# Altium PCB Water Tank Telemeter.PcbDoc (part 2 of 2)
Units mil, origin at the board's own origin, x right, y up, seen from the top; angles counter-clockwise.
Board outline 8312.51 x 5080.46 mil, 2 copper layers (Top Layer, Bottom Layer); 201 components, 141 nets, 680 pads, 198 vias.
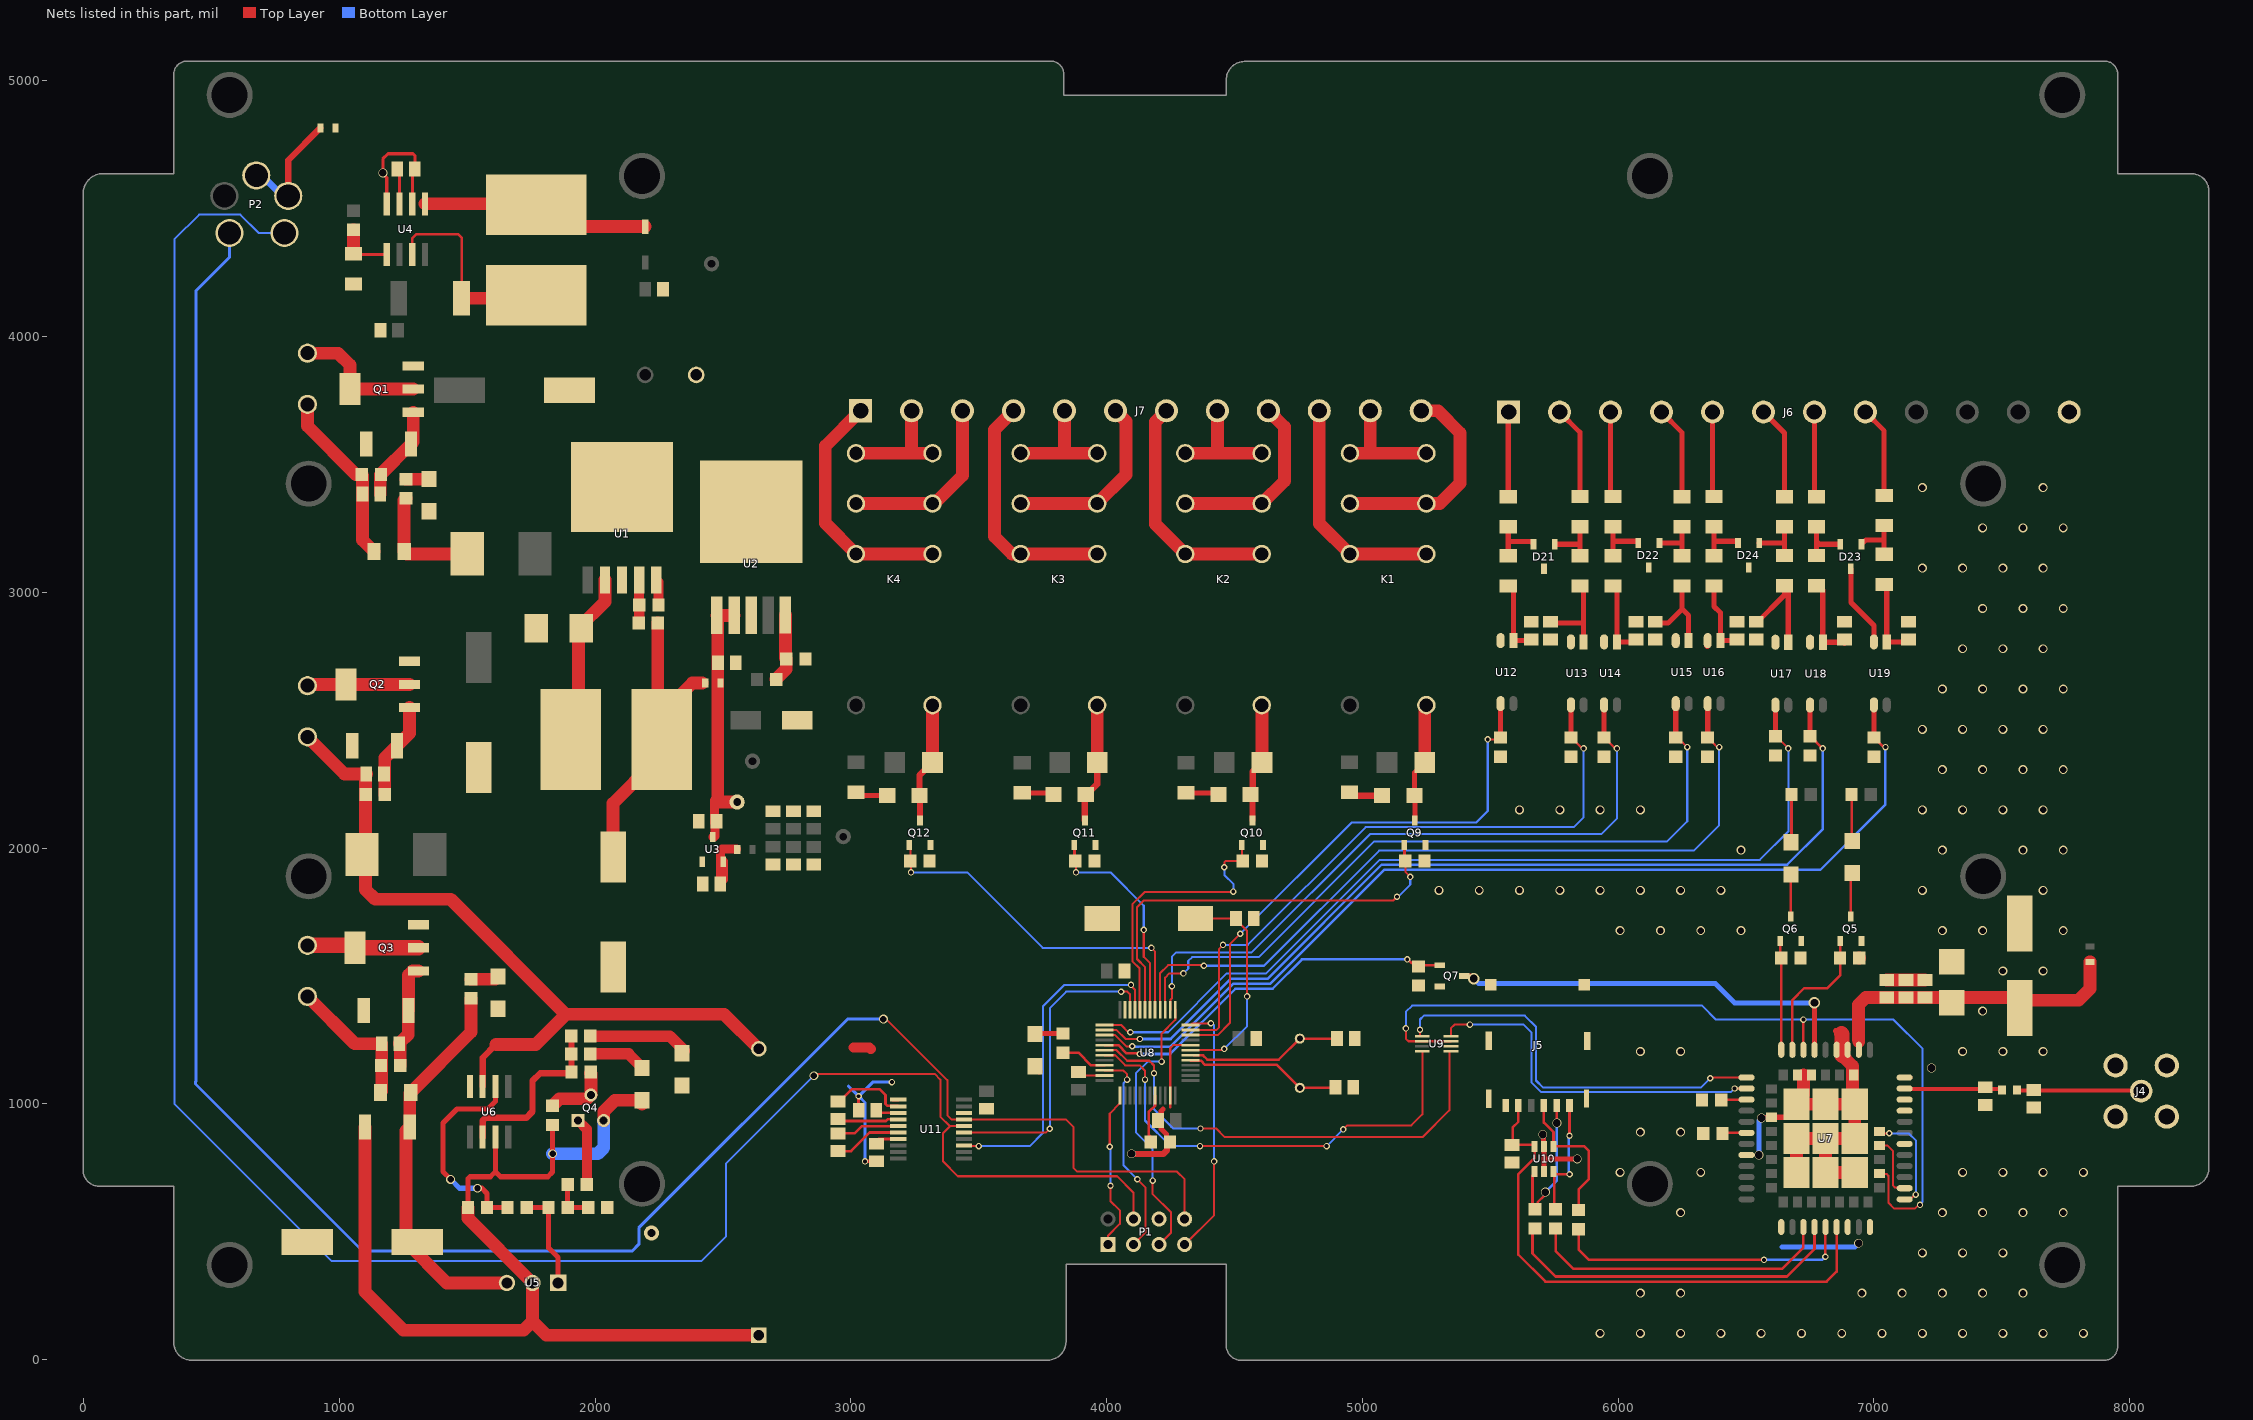
[diagram p2: the nets of this part, all layers, seen from the top]

## Via types
v1: diameter 35, hole 25, Top Layer to Bottom Layer, 102 vias
v2: diameter 25, hole 15, Top Layer to Bottom Layer, tented both sides, 70 vias
v3: diameter 35, hole 30, Top Layer to Bottom Layer, tented both sides, 12 vias
v4: diameter 45, hole 30, Top Layer to Bottom Layer, tented both sides, 6 vias
v5: diameter 35, hole 25, Top Layer to Bottom Layer, tented both sides, 3 vias
v6: diameter 25, hole 15, Top Layer to Bottom Layer, 3 vias
v7: diameter 55, hole 35, Top Layer to Bottom Layer, 1 vias
v8: diameter 40, hole 30, Top Layer to Bottom Layer, tented both sides, 1 vias

## Nets (pads, with @x,y where several pads share a name; then routed paths per layer and width w, separated by ;. In a path a pad name is that pad's centre, name@x,y a point inside that pad or via, vN(x,y) a via of type N, cw(c..) or ccw(c..) an arc to the next point about the centre after c; other vN are vias at no path point) (continued)
GND: C1.2 C2.2 C4.1 C5.2 C6.1 C7.1 C8.2 C9.2 C10.2 C11.2 C12.2 C13.2 C16.1 C17.1 C18.1 C19.2 C20.2 C21.1 C22.1 C23.2 C24.1 C25.1 C26.1 C27.1 C28.1 C29.1 C30.2 C31.2 C32.2 C33.2 C34.1 C35.2 C36.2 C38.1 C40.1 C41.2 C42.2 C43.2 C44.2 C45.2 C46.2 C47.2 C48.2 C49.2 D2.2 D3.2 D4.2 D5.2 D21.3 D22.3 D23.3 D24.3 FB3.1 J4.2 J5.C5 J5.Shield J6.12 LED1.1 LED2.1 LED4.1 LED5.1 P1.6 Q1.3 Q2.3 Q3.3 Q5.1 Q6.1 Q7.1 Q9.1 Q10.1 Q11.1 Q12.1 R1.2 R6.2 R9.1 R15.2 R24.2 R25.2 R29.1 R30.1 R34.1 R35.1 R37.2 R38.2 R39.2 R40.2 R45.2 R46.2 R47.2 R48.1 R49.1 R50.2 R51.2 R52.2 SW1.2 TP5.1 U1.3 U1.5 U1.6 U2.3 U2.PAD U3.2 U4.2 U4.4 U6.4 U7.8 U7.13 U7.19 U7.21 U7.27 U7.30 U7.31 U7.33 U7.36 U7.37 U7.45 U7.63 U7.66 U7.67 U7.69 U7.70 U7.71 U7.72 U7.73 U7.74 U7.75 U7.76 U7.77 U8.8 U8.23 U8.35 U8.47 U9.2 U10.2 U10.5 U11.1 U11.18 U12.2 U13.2 U14.2 U15.2 U16.2 U17.2 U18.2 U19.2 | length 4935.8
  Top Layer w8: C33.2@3890,1124.45 3903.03,1111.42 U8.35@3992,1111.42 ; C36.2@4213.39,953.94 C36.2@4219.39,959.94 ; 4248.58,985 U8.47@4248.58,1032 4248.58,1218.58 4259.53,1229.53 U8.8@4328,1229.53
  Top Layer w12: U4.4@1185,4519.05 1185,4621.48 1170,4636.48 v3(1170,4640) 1170,4695 1190,4715 1287.97,4715 1295,4707.97 1295,4655.55 C10.2@1294.45,4655 1285,4645.55 U4.2@1285,4519.05 ; v2(3030,1030) 3030,975.55 C38.1@3030.55,975 ; v2(3055,775) 3055.55,775.55 C40.1@3100,775.55 ; U11.1@3161.87,1016.18 U11.1@3185,1016.18
  Top Layer w20: 4220,979 4213.39,972.39 4213.39,953.94 4213.39,947.83 C36.2@4200.55,935 4213.39,922.17 4213.39,901.61 4233.5,881.5 4233.5,864 R34.1@4247.5,850 ; v3(5705,880) 5705,875.94 5708,872.94 5708,836 U10.5@5710,834 5710,785 ; U10.2@5710,736 5710,785 ; U13.2@5815,2806.06 U13.2@5815,2819.84 ; v3(5840,785) 5710,785 ; v3(6560,945) 6561.34,946.34 6598.86,946.34 U7.45@6600.2,947.68 6655.31,947.68 6696.65,989.02 U7.69@6696.65,998.86 ; 6725,1113.03 U7.66@6755.71,1113.03 ; D23.3@6910,3092 6910,2960 7000,2870 U19.2@7000,2806.06 ; U7.75@6921.06,1025 6921.06,1002.8 U7.75@6925,998.86 ; U7.33@7119.88,1103.19 U7.33@7140.55,1103.19
  Top Layer w22: 6850,1285 6860.82,1274.18 6872.94,1274.18 ; U7.36@6897.44,1211.46 U7.36@6897.44,1226.74
  Top Layer w25: C40.1@3100,775.55 C40.1@3105.14,770.41 ; LED5.1@3707.99,1135 LED5.1@3720,1147.01 3720,1145.04 LED5.1@3737.03,1128.01 ; v3@4113.71,804 4221.36,804 4236,818.64 4236,838.5 R34.1@4247.5,850 ; U12.2@5540,2811.06 U12.2@5541.24,2809.82 ; U16.2@6348.12,2790.82 6348.76,2791.45 6348.76,2809.82 U16.2@6350,2811.06
  Top Layer w39.37: U1.5@2239,3049 2247.5,3040.5 R1.2@2247.5,2950 ; 3009.53,1220 3072.5,1220 3077.5,1215
  Top Layer w50: U7.71@6696.65,731.14 U7.70@6696.65,865 U7.77@6810.83,865 ; U7.69@6696.65,998.86 U7.76@6810.83,998.86 U7.75@6925,998.86 U7.74@6925,865 U7.77@6810.83,865 ; U7.69@6725,1034.88 6725,1113.03 ; 6875,1190.02 6916.66,1148.35 6916.66,1113.03 6916.66,1029.4 U7.75@6921.06,1025 ; U7.73@6925,731.14 U7.72@6810.83,731.14 U7.77@6810.83,865 ; R30.1@6942.5,1570 6943,1570 R30.1@6943.5,1570.5 ; C16.1@7050,1484.45 C17.1@7125,1484.45 C18.1@7200,1484.45
  Top Layer w60: 6872.94,1274.18 6875,1272.12 6875,1190.02
  Bottom Layer w12: 2990,1070 v2(3030,1030) ; v2(3055,775) 3055,1005 v2(3030,1030) ; v2(3160,1085) 3085,1085 v2(3030,1030)
  Bottom Layer w20: v3(6550,800) 6550,935 v3(6560,945) ; 6640,440 6925.13,440 v3(6940.13,455)
  other v1: 5929.13,102.36 6086.61,102.36 6244.09,102.36 6401.57,102.36 6559.05,102.36 6716.53,102.36 6874.02,102.36 7031.5,102.36 7188.98,102.36 7346.46,102.36 7503.94,102.36 7661.42,102.36 7818.9,102.36 6086.61,259.84 6244.09,259.84 6952.76,259.84 7110.24,259.84 7267.72,259.84 7425.2,259.84 7582.68,259.84 7188.98,417.32 7346.46,417.32 7503.94,417.32 6244.09,574.8 7267.72,574.8 7425.2,574.8 7582.68,574.8 7740.16,574.8 6007.87,732.28 6322.83,732.28 7346.46,732.28 7503.94,732.28 7661.42,732.28 7818.9,732.28 6086.61,889.76 6244.09,889.76 6086.61,1204.72 6244.09,1204.72 7346.46,1204.72 7503.94,1204.72 7661.42,1204.72 7425.2,1362.2 7503.94,1519.68 7661.42,1519.68 6007.87,1677.17 6165.35,1677.17 6322.83,1677.17 6480.31,1677.17 7267.72,1677.17 7425.2,1677.17 7740.16,1677.17 5299.21,1834.65 5456.69,1834.65 5614.17,1834.65 5771.65,1834.65 5929.13,1834.65 6086.61,1834.65 6244.09,1834.65 6401.57,1834.65 7188.98,1834.65 7661.42,1834.65 6480.31,1992.13 7267.72,1992.13 7582.68,1992.13 7740.16,1992.13 5614.17,2149.61 5771.65,2149.61 5929.13,2149.61 6086.61,2149.61 7188.98,2149.61 7346.46,2149.61 7503.94,2149.61 7661.42,2149.61 7267.72,2307.09 7425.2,2307.09 7582.68,2307.09 7740.16,2307.09 7188.98,2464.57 7346.46,2464.57 7503.94,2464.57 7661.42,2464.57 7267.72,2622.05 7425.2,2622.05 7582.68,2622.05 7740.16,2622.05 7346.46,2779.53 7503.94,2779.53 7661.42,2779.53 7425.2,2937.01 7582.68,2937.01 7740.16,2937.01 7188.98,3094.49 7346.46,3094.49 7503.94,3094.49 7661.42,3094.49 7425.2,3251.97 7582.68,3251.97 7740.16,3251.97 7188.98,3409.45 7661.42,3409.45
  other v3: 4097.29,805 7225,1140
NetC2_1: C2.1 FB1.1 L1.1 R2.1 | length 1142.5
  Top Layer w50: C2.1@2070,2040 2070,2175 2229,2334 2229,2425 2245,2441 L1.1@2245,2510 ; R2.1@2245,2880 L1.1@2245,2510 ; FB1.1@2419.06,2645 2380,2645 L1.1@2245,2510
NetC3_1: C3.1 D2.1 Q1.1 R3.2 | length 374.2
  Top Layer w50: C3.1@1159.45,3385 1159.45,3456.95 R3.2@1162.5,3460 ; R3.2@1159.93,3460 D2.1@1279.93,3580 1289,3589.07 Q1.1@1289,3704.45
NetC3_2: C3.2 F1.2 J1.2 R3.1 | length 695.9
  Top Layer w50: J1.2@875,3735 875,3650 1065,3460 R3.1@1087.5,3460 1090.55,3456.95 C3.2@1090.55,3385 1090.55,3204.45 F1.2@1135,3160
NetC4_2: C4.2 C6.2 FB1.2 TP1.1 U2.1 U2.2 U3.3 | length 1029.6
  Top Layer w35: U3.3@2460,2043 2464,2043 2469.11,2048.11 2469.11,2099.67 C6.2@2474.45,2105 ; C6.2@2465.83,2098.83 2465.83,2171.94
  Top Layer w50: 2474.11,2185.05 2474.06,2180.16 ; 2478.9,2185 2474.06,2180.16 ; 2479.45,2185 2479.45,2906.69 U2.1@2476.14,2910 U2.2@2543.07,2910 ; TP1.1@2555,2180 2474.06,2180 2474.06,2180.16
NetC7_2: C7.2 FB2.1 U3.1 | length 282.8
  Top Layer w35: C7.2@2489.45,1860 C7.2@2489.45,1866.1 ; U3.1@2501.34,1947 2501.34,1877.99 C7.2@2489.45,1866.1 ; FB2.1@2553.47,1997 2496.34,1997 2489.45,1990.11 C7.2@2489.45,1866.1
NetC10_1: C10.1 U4.3 | length 139.9
  Top Layer w12: C10.1@1225.55,4655 1235,4645.55 U4.3@1235,4519.05
NetC13_1: C13.1 D7.1 F2.1 R22.1 U5.3 | length 1519.4
  Top Layer w50: R22.1@1515,1412.5 1515,1281 F2.1@1279,1045 1274.93,1040.93 D7.1@1274.93,910 1260,895.07 1260,460 1420,300 U5.3@1655,300
NetC14_1: C14.1 D4.1 Q2.1 R20.2 | length 379.4
  Top Layer w50: R20.2@1177.5,2210 1177.5,2352.57 D4.1@1224.93,2400 1274,2449.07 Q2.1@1274,2549.45
NetC14_2: C14.2 D8.2 J3.2 R10.2 R20.1 U6.3 | length 3032.9
  Top Layer w25: U6.3@1560,1068.09 1560,1180 1612.5,1232.5
  Top Layer w50: J3.2@875,2435 1020,2290 C14.2@1105.55,2290 1102.5,2286.95 R20.1@1102.5,2210 1102.5,1837.5 1140,1800 1435,1800 1885,1350 2505,1350 R10.2@2640,1215 ; 1612.5,1232.5 1767.5,1232.5 1875,1340
NetC15_1: C15.1 D3.1 Q3.1 R21.2 | length 418.6
  Top Layer w50: C15.1@1234.45,1235 1234.45,1236.77 C15.1@1237.5,1239.82 ; R21.2@1237.5,1150 C15.1@1237.5,1239.82 ; Q3.1@1309,1519.45 1286,1519.45 1269.93,1503.38 D3.1@1269.93,1365 1268.93,1364 1268.93,1271.25 C15.1@1237.5,1239.82
NetC15_2: C15.2 F2.2 J2.2 R21.1 | length 559.1
  Top Layer w50: J2.2@875,1420 1060,1235 C15.2@1165.55,1235 1165.55,1049.55 F2.2@1161,1045
NetC16_2: C16.2 C17.2 C18.2 C19.1 C20.1 FB5.1 U7.35 | length 1222.3
  Top Layer w50: U7.35@6940.75,1242.65 6940.75,1249.71 6940,1250.46 6940,1387.77 6967.23,1415 6967.5,1415 6968.05,1415.55 C16.2@7050,1415.55 C17.2@7125,1415.55 C18.2@7200,1415.55 7545,1415.55 7570,1390.55 C20.1@7570,1380 ; C20.1@7570,1375 C20.1@7570,1380 ; FB5.1@7845,1555.47 7845,1450 7800,1405 7595,1405 C20.1@7570,1380
NetC21_2: C21.2 J4.1 R23.2 | length 487.1
  Top Layer w12: R23.2@7560,1055 R23.2@7562.5,1052.5 ; J4.1@8042.5,1052.5 J4.1@8045,1050
  Top Layer w14.8: R23.2@7562.5,1052.5 J4.1@8042.5,1052.5
NetC22_2: C22.2 R23.1 U7.32 | length 383.7
  Top Layer w12: U7.32@7119.88,1059.88 U7.32@7122.11,1057.66 ; R23.1@7498.29,1057.66 R23.1@7500.94,1055
  Top Layer w14.8: U7.32@7122.11,1057.66 7434.57,1057.66 R23.1@7498.29,1057.66
  Top Layer w20: C22.2@7434.57,1059.88 C22.2@7435,1059.45
NetC23_1: C23.1 J5.C1 U7.18 U10.6 | length 2183.6
  Top Layer w10: J5.C1@5609.61,993.94 5610,993.54 5610,930 5587.11,907.11 5587.11,841.56 C23.1@5585,839.45 5667.55,839.45 U10.6@5673,834 5673,788.39 5610,725.39 5610,410 5715,305 6815,305 6854.13,344.13 U7.18@6854.13,518.54
NetC30_1: C30.1 SW1.1 U8.7 | length 857.2
  Top Layer w8: U8.7@4328,1209.84 4454.84,1209.84 v2(4460,1215) ; SW1.1@4345,1727.09 SW1.1@4347.09,1725 4500,1725 4549,1675.98 v2(4549,1420)
  Bottom Layer w8: v2(4460,1215) 4549,1304 v2(4549,1420)
NetC31_1: C31.1 U8.6 Y1.1 | length 595.7
  Top Layer w10: U8.6@4341,1190.16 4341.44,1189.72 4341.72,1190 4358.28,1190 4359,1189.29 4376.67,1189.29 4393.46,1172.5 4672.5,1172.5 Y1.1@4755,1255 C31.1@4895,1255
NetC32_1: C32.1 U8.5 Y1.2 | length 616
  Top Layer w10: U8.5@4328,1170.47 4328,1169.29 4368.38,1169.29 4385.17,1152.5 4665.37,1152.5 Y1.2@4755,1062.87 ; Y1.2@4752.13,1062.87 Y1.2@4755,1062.87 ; C32.1@4895,1065 4892.87,1062.87 Y1.2@4755,1062.87
NetC37_1: C37.1 U11.4 | length 240.7
  Top Layer w10: C37.1@2950,940.55 2957.49,933.06 3137.12,933.06 3143.46,939.41 U11.4@3185,939.41
NetC37_2: C37.2 U11.2 | length 302.6
  Top Layer w10: C37.2@2950,1009.45 2956.1,1009.45 3004.15,1057.5 3111.93,1057.5 3135.28,1034.14 3135.28,1000 3141.82,993.46 3182.13,993.46 U11.2@3185,990.59
NetC38_2: C38.2 U11.3 | length 83.2
  Top Layer w10: C38.2@3103.9,970 3108.9,965 U11.3@3185,965
NetC39_1: C39.1 U11.6 | length 265.1
  Top Layer w10: C39.1@2950,815.55 3000.95,815.55 3073.46,888.06 3184.84,888.06 U11.6@3185,888.23
NetC39_2: C39.2 U11.5 | length 247.2
  Top Layer w10: C39.2@2950,884.45 3014.45,884.45 3043.06,913.06 3184.24,913.06 U11.5@3185,913.82
NetC40_2: C40.2 U11.7 | length 88.4
  Top Layer w10: C40.2@3100,854.45 3108.19,862.64 U11.7@3185,862.64
NetC42_1: C42.1 R53.2 U12.1 | length 296.4
  Top Layer w20: R53.2@5570,3025 5574,3025 5590,3009 U12.1@5590,2811.06 5655.51,2811.06 C42.1@5660,2815.55
NetC43_1: C43.1 R54.2 U13.1 | length 357.2
  Top Layer w20: C43.1@5735,2880 5860,2880 5865,2885 ; R54.2@5850,3025 5865,3010 5865,2885 ; U13.1@5865,2806.06 5865,2885
NetC44_1: C44.1 R55.2 U14.1 | length 287
  Top Layer w20: R55.2@5980,3025 5995,3010 U14.1@5995,2806.06 6050.51,2806.06 C44.1@6055,2810.55
NetC45_1: C45.1 R56.2 U15.1 | length 362.3
  Top Layer w20: C45.1@6135,2879.45 6194.45,2879.45 6250,2935 ; R56.2@6250,3025 6250,2935 ; U15.1@6275,2811.06 6275,2910 6250,2935
NetC46_1: C46.1 R57.2 U16.1 | length 289.5
  Top Layer w20: R57.2@6375,3025 6375,2945 6400,2920 U16.1@6400,2811.06 6464.49,2811.06 C46.1@6465,2810.55
NetC47_1: C47.1 R58.2 U17.1 | length 419.3
  Top Layer w20: C47.1@6540,2879.45 6650,2989.45 R58.2@6650,3026 6665,3011 U17.1@6665,2805
NetC48_1: C48.1 R59.2 U18.1 | length 322.6
  Top Layer w20: R59.2@6775,3026 6782.5,3026 6800,3008.5 U18.1@6800,2805 6880.55,2805 C48.1@6885,2800.55
NetC49_1: C49.1 R60.2 U19.1 | length 314.3
  Top Layer w20: R60.2@7040,3031 7050,3021 U19.1@7050,2806.06 7134.49,2806.06 C49.1@7135,2805.55
NetD1_2: D1.2 F1.1 R4.1 | length 483.5
  Top Layer w50: R4.1@1260,3367.5 1253,3360.5 F1.1@1253,3160 1263,3150 D1.2@1522,3150
NetD5_1: D5.1 L1.2 U1.2 | length 668.6
  Top Layer w50: L1.2@1939,2425 1934.62,2429.38 1934.62,2860 2038,2963.38 U1.2@2038,3049
NetD6_2: D6.2 L2.1 U4.1 | length 801.9
  Top Layer w50: U4.1@1335,4519.05 1735.95,4519.05 1770,4485 L2.1@1825.09,4429.91 ; L2.1@1920.09,4429.91 D6.2@2195,4429.91
NetD7_2: D7.2 LED3.2 Q4.3 R10.1 R11.1 R16.1 U5.2 U6.7 | length 4157.3
  Top Layer w20: R11.1@1502.5,595 1502.5,707.5 1510,715 1590,715 1610,735 ; U6.7@1610,870 1610,735 ; R16.1@1833.5,917.5 v5(1833.5,805) 1833.5,733.5 1815,715 1630,715 1610,735
  Top Layer w50: D7.2@1100,910 1100,265 1250,115 1720,115 1755,150 ; R11.1@1502.5,595 1502.5,552.5 U5.2@1755,300 1755,150 ; Q4.3@2033.31,934.86 2033.31,969.81 2077.52,1014.02 LED3.2@2183.5,1014.02 LED3.2@2183.5,1000 ; R10.1@2640,95 1810,95 1755,150
  Bottom Layer w50: v5(1833.5,805) 2010,805 2033.31,828.31 Q4.3@2033.31,934.86
NetD17_1: D17.1 K1.1 LED8.1 Q9.3 | length 471.3
  Top Layer w20: Q9.3@5205,2108 5205,2202.99 LED8.1@5202.99,2205 5202.99,2294.57 D17.1@5243.43,2335
  Top Layer w50: D17.1@5243.43,2335 5243.43,2552.43 K1.1@5250,2559
NetD18_1: D18.1 K2.1 LED9.1 Q10.3 | length 466.5
  Top Layer w25: Q10.3@4570,2108 4570,2203.58 4571.42,2205 4571.42,2299.57 D18.1@4606.85,2335
  Top Layer w50: K2.1@4606.33,2559 4606.85,2558.48 D18.1@4606.85,2335
NetD19_1: D19.1 K3.1 LED10.1 Q11.3 | length 471.4
  Top Layer w25: Q11.3@3915,2108 3915,2202.01 3963.43,2250.43 D19.1@3963.43,2335
  Top Layer w50: K3.1@3962.67,2559 3963.43,2558.24 D19.1@3963.43,2335
NetD20_1: D20.1 K4.1 LED11.1 Q12.3 | length 473
  Top Layer w8: LED11.1@3267.99,2205 LED11.1@3267.99,2220
  Top Layer w25: LED11.1@3267.99,2205 3270,2202.99 Q12.3@3270,2108 ; LED11.1@3267.99,2220 3267.99,2284.57 D20.1@3318.43,2335
  Top Layer w50: D20.1@3318.43,2335 3319,2335.57 K4.1@3319,2559
NetD21_1: D21.1 R53.1 R61.2 | length 221.7
  Top Layer w20: R53.1@5570,3143 5570,3199.5 ; R61.2@5570,3256 5570,3199.5 ; D21.1@5668.66,3188 5668.66,3197 5667.66,3198 5658.66,3198 5657.16,3199.5 5570,3199.5
NetD21_2: D21.2 R54.1 R62.2 | length 213.5
  Top Layer w20: D21.2@5751.34,3188 5848,3188 5850,3190 ; R54.1@5850,3143 5850,3190 ; R62.2@5850,3257 5850,3190
NetD22_1: D22.1 R55.1 R63.2 | length 219.1
  Top Layer w20: R55.1@5980,3143 5980,3200 ; R63.2@5980,3257 5980,3200 ; D22.1@6078.66,3193 6078.66,3199 6077.66,3200 5980,3200
NetD22_2: D22.2 R56.1 R64.2 | length 204.4
  Top Layer w20: D22.2@6161.34,3193 6243.5,3193 6250,3199.5 ; R56.1@6250,3143 6250,3199.5 ; R64.2@6250,3256 6250,3199.5
NetD23_1: D23.1 R59.1 R67.2 | length 210.6
  Top Layer w20: R59.1@6775,3144 6775,3200 ; R67.2@6775,3256 6775,3200 ; D23.1@6868.66,3188 6787,3188 6775,3200
NetD23_2: D23.2 R60.1 R68.2 | length 213
  Top Layer w20: D23.2@6951.34,3188 6951.34,3197 6952.34,3198 6961.34,3198 6968.34,3205 7040,3205 ; R60.1@7040,3149 7040,3205 ; R68.2@7040,3261 7040,3205
NetD24_1: D24.1 R57.1 R65.2 | length 214.1
  Top Layer w20: R57.1@6375,3143 6375,3200 ; R65.2@6375,3257 6375,3200 ; D24.1@6468.66,3193 6468.66,3199 6467.66,3200 6375,3200
NetD24_2: D24.2 R58.1 R66.2 | length 213.6
  Top Layer w20: D24.2@6551.34,3193 6643,3193 6650,3200 ; R58.1@6650,3144 6650,3200 ; R66.2@6650,3256 6650,3200
NetFB3_2: FB3.2 P2.3 P2.4 | length 475.6
  Top Layer w25: P2.4@800,4550 800,4690 FB3.2@925.47,4815.47
  Bottom Layer w25: P2.3@675,4630 697.5,4630 777.5,4550 P2.4@800,4550
NetJ1_1: J1.1 Q1.2 | length 527.1
  Top Layer w50: J1.1@875,3935 995,3935 1041,3889 Q1.2@1041,3795 Q1.2@1289,3795
NetJ2_1: J2.1 Q3.2 | length 438.1
  Top Layer w60: J2.1@875,1620 1051,1620 Q3.2@1061,1610 Q3.2@1309,1610
NetJ3_1: J3.1 Q2.2 | length 401.1
  Top Layer w50: J3.1@875,2635 880,2640 Q2.2@1026,2640 Q2.2@1274,2640
NetJ5_C2: J5.C2 R28.1 U10.4 | length 569.3
  Top Layer w10: J5.C2@5709.61,993.94 5709.61,927.12 5747,889.73 U10.4@5747,834 5748,835 5865.96,835 5885,815.96 5885,705.36 5845,665.36 R28.1@5845,585
NetJ5_C3: J5.C3 R27.1 U10.1 | length 603.6
  Top Layer w10: U10.1@5673,736 5673,726.5 5665,718.5 5665,585 5666.5,585 5685.5,604 5685.5,615.5 5710.22,640.22 5710.22,650.22 v3(5715,655) ; J5.C3@5759.61,993.94 5759.61,925.39 v3(5760,925)
  Bottom Layer w10: v3(5715,655) 5760,700 v3(5760,925)
NetJ5_C7: J5.C7 R26.1 U10.3 | length 489
  Top Layer w10: U10.3@5747,736 U10.3@5750,733 ; R26.1@5755,585 5750,590 U10.3@5750,733 ; J5.C7@5809.61,993.94 v2(5809.61,875.39) v2@5810,875 ; v2(5810,725) 5758,725 U10.3@5750,733
  Bottom Layer w10: v2(5809.61,875.39) 5807.5,873.29 5807.5,727.5 v2(5810,725)
NetJ6_1: J6.1 R61.1 | length 331.6
  Top Layer w20: R61.1@5570,3374 5570,3703.45 J6.1@5571.55,3705
NetJ6_2: J6.2 R62.1 | length 362.8
  Top Layer w20: J6.2@5770.82,3705 5850,3625.82 R62.1@5850,3375
NetJ6_3: J6.3 R63.1 | length 334.1
  Top Layer w20: J6.3@5970.09,3705 5970.09,3384.91 R63.1@5980,3375
NetJ6_4: J6.4 R64.1 | length 364.4
  Top Layer w20: J6.4@6169.37,3705 6250,3624.37 R64.1@6250,3374
NetJ6_5: J6.5 R65.1 | length 332.6
  Top Layer w20: J6.5@6368.64,3705 6368.64,3381.36 R65.1@6375,3375
NetJ6_6: J6.6 R66.1 | length 365
  Top Layer w20: J6.6@6567.91,3705 6650,3622.91 R66.1@6650,3374
NetJ6_7: J6.7 R67.1 | length 334.2
  Top Layer w20: J6.7@6767.18,3705 6767.18,3381.82 R67.1@6775,3374
NetJ6_8: J6.8 R68.1 | length 356.5
  Top Layer w20: J6.8@6966.46,3705 7040,3631.46 R68.1@7040,3379
NetJ7_1: J7.1 K4.2 K4.7 | length 965.8
  Top Layer w50: J7.1@3037.91,3710 2900,3572.09 2900,3270 K4.7@3020,3150 K4.2@3319,3150
NetJ7_2: J7.2 K4.4 K4.5 | length 465
  Top Layer w50: K4.5@3020,3544 3237.18,3544 ; J7.2@3237.18,3710 3237.18,3544 ; K4.4@3319,3544 3237.18,3544
NetJ7_3: J7.3 K4.3 K4.6 | length 715.3
  Top Layer w50: K4.6@3020,3347 K4.3@3319,3347 3327,3347 3436.45,3456.45 J7.3@3436.45,3710
NetJ7_4: J7.4 K3.2 K3.7 | length 952.1
  Top Layer w50: J7.4@3635.73,3710 3561.17,3635.44 3561.17,3218.83 3630,3150 K3.7@3663.67,3150 K3.2@3962.67,3150
NetJ7_5: J7.5 K3.4 K3.5 | length 580.9
  Top Layer w50: K3.5@3663.67,3544 K3.4@3946.33,3544 ; J7.5@3835,3710 3835,3545 3835.73,3544.27 3967.65,3544.27 K3.4@3967.67,3544
NetJ7_6: J7.6 K3.3 K3.6 | length 725.5
  Top Layer w50: K3.6@3663.67,3347 K3.3@3962.67,3347 4075.17,3459.5 4075.17,3669.11 J7.6@4034.27,3710
NetJ7_7: J7.7 K2.2 K2.7 | length 925.6
  Top Layer w50: J7.7@4233.55,3710 4190,3666.45 4190,3267.33 K2.7@4307.33,3150 K2.2@4606.33,3150
NetJ7_8: J7.8 K2.4 K2.5 | length 446.3
  Top Layer w50: K2.5@4307.33,3544 K2.4@4588.67,3544 ; 4432.82,3545 J7.8@4432.82,3710
NetJ7_9: J7.9 K2.3 K2.6 | length 724.8
  Top Layer w50: K2.6@4307.33,3347 K2.3@4606.33,3347 4695,3435.67 4695,3647.09 J7.9@4632.09,3710
NetJ7_10: J7.10 K1.2 K1.7 | length 908.6
  Top Layer w50: J7.10@4831.36,3710 4831.36,3269.64 K1.7@4951,3150 K1.2@5250,3150
NetJ7_11: J7.11 K1.4 K1.5 | length 469.3
  Top Layer w50: K1.5@4951,3544 5041,3544 ; J7.11@5030.64,3710 5030.64,3554.36 5041,3544 ; K1.4@5250,3544 5041,3544
NetJ7_12: J7.12 K1.3 K1.6 | length 848.2
  Top Layer w50: K1.6@4951,3347 K1.3@5250,3347 5302,3347 5381.91,3426.91 5381.91,3623.09 5295,3710 J7.12@5229.91,3710
NetL2_2: L2.2 R7.2 U4.7 | length 816.3
  Top Layer w10: U4.7@1285,4320.95 1285,4385 1300,4400 1465,4400 1478,4387 R7.2@1478,4150
  Top Layer w50: R7.2@1478,4150 1725,4150 L2.2@1770,4195
NetLED1_2: LED1.2 R22.2 | length 109.3
  Top Layer w50: R22.2@1515,1487.5 1609.51,1487.5 LED1.2@1620,1497.99
NetLED2_2: LED2.2 R4.2 | length 90.2
  Top Layer w50: R4.2@1260,3442.5 1349.51,3442.5 LED2.2@1350,3442.99
NetLED3_1: LED3.1 R18.1 | length 226.4
  Top Layer w20: LED3.1@2183.5,1140 LED3.1@2183.5,1141.97
  Top Layer w45: R18.1@1981,1195 2130.47,1195 LED3.1@2183.5,1141.97
NetLED4_2: LED4.2 R19.2 | length 391.9
  Top Layer w45: R19.2@1981,1265 2291.49,1265 LED4.2@2349.05,1207.44
NetLED5_2: LED5.2 R33.1 | length 112.5
  Top Layer w10: R33.1@3827.99,1272.99 R33.1@3830,1275
  Top Layer w20: LED5.2@3720,1272.99 3722.01,1275 3825.98,1275 R33.1@3827.99,1272.99
NetLED6_1: LED6.1 Q5.3 | length 166.6
  Top Layer w10: Q5.3@6903.66,1736 6903.66,1745 6910,1751.34 LED6.1@6910,1900
NetLED6_2: LED6.2 R31.2 | length 185.1
  Top Layer w10: LED6.2@6910,2025.98 6912.5,2028.48 R31.2@6912.5,2210
NetLED7_1: LED7.1 Q6.3 | length 164
  Top Layer w10: Q6.3@6675,1733 LED7.1@6675,1897.01
NetLED7_2: LED7.2 R32.2 | length 188
  Top Layer w10: LED7.2@6675,2022.99 6677.5,2025.49 R32.2@6677.5,2210
NetLED8_2: LED8.2 R41.1 | length 132.4
  Top Layer w25: R41.1@4950,2218.01 4963.01,2205 LED8.2@5077.01,2205
NetLED9_2: LED9.2 R42.1 | length 129.5
  Top Layer w20: R42.1@4310,2216 4431.01,2216 LED9.2@4437.01,2210
NetLED10_2: LED10.2 R43.1 | length 129.5
  Top Layer w20: R43.1@3670,2216 3791.01,2216 LED10.2@3797.01,2210
NetLED11_2: LED11.2 R44.1 | length 127.4
  Top Layer w20: R44.1@3020,2218.01 3033.01,2205 LED11.2@3142.01,2205
NetP1_1: P1.1 U8.37 | length 634.1
  Top Layer w8: P1.1@4005,450 4005,484.2 4051.53,530.73 4051.53,583.47 4015,620 v2(4015,680) ; v2(4012,832) 4012,962 4051.73,1001.73 U8.37@4051.73,1032
  Bottom Layer w8: v2(4012,832) 4015,829 v2(4015,680)
NetP1_3: P1.3 U8.34 | length 820.3
  Top Layer w8: U8.34@3992,1131.1 4063.9,1131.1 4080,1115 v2(4080,1095) ; P1.3@4105,450 4151.53,496.53 4151.53,673.47 v2(4120,705)
  Bottom Layer w8: v2(4080,1095) 4065.79,1080.79 4065.79,759.21 v2(4120,705)
NetP1_5: P1.5 U8.13 | length 1090.1
  Top Layer w8: v2(4180,700) 4180,647.33 4251.53,575.8 4251.53,496.53 P1.5@4205,450 ; v2(4215,1165) 4215,1275 4268.27,1328.27 U8.13@4268.27,1368
  Bottom Layer w8: v2(4180,700) 4180,823.04 4114.32,888.72 4114.32,1119.32 4160,1165 v2(4215,1165)
NetP1_7: P1.7 U8.12 | length 1005.6
  Top Layer w8: P1.7@4305,450 4420,565 v2(4420,775) ; U8.12@4328,1308.27 4334.81,1315.08 v2(4407.26,1315.08)
  Bottom Layer w8: v2(4407.26,1315.08) 4410,1317.83 4420,1307.83 v2(4420,775)
NetQ4_1: Q4.1 R14.1 | length 264
  Top Layer w39.37: Q4.1@1933.31,934.86 1967.5,900.67 R14.1@1967.5,685
NetQ4_2: Q4.2 R16.2 R17.2 | length 254
  Top Layer w50: R16.2@1833.5,992.5 1833.5,993 1834,993.5 1834.5,993.5 1861,1020 1968.44,1020 Q4.2@1983.31,1034.86 1983.31,1118.19 1981.5,1120 R17.2@1981,1120
NetQ5_2: Q5.2 R30.2 U7.41 | length 556
  Top Layer w10: U7.41@6680.91,1211.46 6680.91,1405.91 6727.5,1452.5 6817.5,1452.5 6867.5,1502.5 R30.2@6867.5,1570 6868.66,1571.16 Q5.2@6868.66,1637
NetQ6_2: Q6.2 R29.2 U7.42 | length 427.2
  Top Layer w10: Q6.2@6633.66,1637 6633.66,1573.84 R29.2@6637.5,1570 6637.6,1569.9 U7.42@6637.6,1211.46
NetQ7_2: Q7.2 R35.2 U8.29 | length 1497.6
  Top Layer w10: U8.29@3992,1229.53 4045.67,1229.53 4077.7,1197.5 4127.5,1197.5 v2(4130,1195) ; v6(5175,1565) 5178.5,1565 5208.5,1535 5210,1535 5216.34,1541.34 Q7.2@5302,1541.34
  Bottom Layer w10: v2(4130,1195) 4248.28,1195 4503.28,1450 4648.28,1450 4763.28,1565 v6(5175,1565) v6@5180,1565
NetQ7_3: Q7.3 U7.39 | length 1596.6
  Top Layer w20: Q7.3@5398,1500 5399,1499 5421.94,1499 5430.94,1490 v4(5435,1490) ; U7.39@6767.52,1211.46 v4(6767.52,1395)
  Bottom Layer w20: v4(5435,1490) 5455,1470 6380,1470 6455,1395 v4(6767.52,1395)
NetQ9_2: Q9.2 R37.1 U8.19 | length 1685.7
  Top Layer w8: U8.19@4150.16,1368 4150.16,1534.84 4118.5,1566.5 4118.5,1768.5 4145,1795 5120,1795 v2(5135,1810) ; R37.1@5167.5,1950 5167.5,1907 v2(5187,1887.5)
  Top Layer w12: R37.1@5163.66,1946.16 Q9.2@5163.66,2012
  Bottom Layer w8: v2(5135,1810) 5140,1810 5187,1857 v2(5187,1887.5)
NetQ10_2: Q10.2 R38.1 U8.20 | length 1108.7
  Top Layer w8: U8.20@4130.47,1368 4129,1369.47 4129,1529.19 4100.5,1557.69 4100.5,1780.5 4148,1828 4495,1828 v2(4495,1830) ; v2(4460,1925) 4460,1945 4465,1950 R38.1@4532.5,1950 4528.66,1953.84 Q10.2@4528.66,2012
  Bottom Layer w8: v2(4460,1925) 4460,1895 4495,1860 v2(4495,1830)
NetQ11_2: Q11.2 R39.1 U8.18 | length 845.8
  Top Layer w8: R39.1@3873.66,1953.84 R39.1@3877.5,1950 3880,1947.5 v2(3880,1905) ; v2(4145,1680) 4145,1574.84 4169.84,1550 U8.18@4169.84,1368
  Top Layer w12: R39.1@3873.66,1953.84 Q11.2@3873.66,2012
  Bottom Layer w8: v2(3880,1905) 4015,1905 4145,1775 v2(4145,1680)
NetQ12_2: Q12.2 R40.1 U8.17 | length 1419.8
  Top Layer w8: Q12.2@3228.66,2012 3232.5,2008.16 R40.1@3232.5,1950 3235,1947.5 v2(3235,1905) ; v2(4175,1610) 4189.53,1595.47 U8.17@4189.53,1368
  Bottom Layer w8: v2(3235,1905) 3455,1905 3750,1610 v2(4175,1610)
NetR1_1: R1.1 R2.2 U1.4 | length 238.7
  Top Layer w25: R2.2@2170,2880 2172,2882 R1.1@2172,2950.5
  Top Layer w39.37: R2.2@2172,2882 2172.5,2882.5 R1.1@2172.5,2950 2172,2950.5 U1.4@2172,3049
NetR5_2: R5.2 R6.1 U2.5 | length 269.1
  Top Layer w50: R5.2@2707.5,2660 2747.5,2700 R6.1@2747.5,2740 2743.86,2743.64 U2.5@2743.86,2911
NetR8_2: R8.2 R9.2 U4.5 | length 224.8
  Top Layer w12: R9.2@1055,4324 1058.05,4320.95 U4.5@1185,4320.95
  Top Layer w50: R9.2@1055,4324 R8.2@1055,4417.5
NetR11_2: R11.2 R12.1 U6.2 | length 831
  Top Layer w20: v5(1435,705) 1405,735 1405,925 1460,980 1580,980 1610,1010 U6.2@1610,1068.09 ; v5(1540,670) 1557.5,670 1577.5,650 R11.2@1577.5,595 R12.1@1657.5,595
  Bottom Layer w20: v5(1435,705) 1470,670 v5(1540,670)
NetR12_2: R12.2 R13.1 U5.1 | length 395.5
  Top Layer w20: R12.2@1732.5,595 R13.1@1817.5,595 1817.5,437.5 1855,400 U5.1@1855,300
NetR13_2: R13.2 R14.2 R15.1 | length 170
  Top Layer w20: R14.2@1892.5,685 R13.2@1892.5,595 R15.1@1972.5,595
NetR17_1: R17.1 R18.2 R19.1 U6.6 | length 702.1
  Top Layer w25: U6.6@1560,870 1560,935 1570,945 1730,945 1755,970 1755,1090 1785,1120 1902.5,1120 R17.1@1907.5,1125 1907.5,1263.5 R19.1@1906,1265
NetR24_1: R24.1 U7.3 | length 99.9
  Top Layer w10: R24.1@6402.5,1015 6404.07,1016.57 U7.3@6501.77,1016.57
NetR25_1: R25.1 U7.6 | length 95
  Top Layer w10: R25.1@6407.5,885 6409.15,886.65 U7.6@6501.77,886.65
NetR26_2: R26.2 U7.15 | length 1197.4
  Top Layer w10: R26.2@5755,510 5755,425 5825,355 6640,355 6724.21,439.21 U7.15@6724.21,518.54
NetR27_2: R27.2 U7.16 | length 1365.4
  Top Layer w10: R27.2@5665,510 5665,415 5755,325 6660,325 6767.52,432.52 U7.16@6767.52,518.54
NetR28_2: R28.2 U7.17 | length 1183.1
  Top Layer w10: R28.2@5845,510 5845,430 5885,390 v2(6570,390) ; v2(6810,402.5) 6810.41,402.91 6810.41,518.13 U7.17@6810.83,518.54
  Bottom Layer w10: v2(6570,390) 6797.5,390 v2(6810,402.5)
NetR33_2: R33.2 U8.33 | length 182.4
  Top Layer w10: R33.2@3830,1200 3890,1200 3939.21,1150.79 U8.33@3992,1150.79
NetR34_2: R34.2 U8.44 | length 176.3
  Top Layer w10: R34.2@4172.5,870 4164.72,877.78 4164.72,969.32 4175.86,980.47 4177.2,980.47 4189.03,992.3 4189.03,1031.5 U8.44@4189.53,1032
NetR45_1: R45.1 U8.10 U12.3 | length 2170.9
  Top Layer w8: U8.10@4328,1268.9 4354.24,1268.9 4354.35,1269 4434.46,1269 4481.5,1316.04 4481.5,1624 v2(4522.5,1665) ; v6(5490,2425) 5532.5,2425 R45.1@5540,2432.5
  Top Layer w20: R45.1@5540,2432.5 U12.3@5540,2565
  Bottom Layer w8: v2(4522.5,1665) 4957.5,2100 5445,2100 5490,2145 v6(5490,2425)
NetR46_1: R46.1 U8.11 U13.3 | length 2526
  Top Layer w8: U8.11@4328,1288.58 4428.58,1288.58 4440,1300 4440,1606.38 v2(4455,1621.38) ; R46.1@5815,2432.5 5816.5,2432.5 5855.75,2393.25 5861.75,2393.25 v2(5865,2390)
  Top Layer w20: R46.1@5815,2432.5 U13.3@5815,2560
  Bottom Layer w8: v2(4455,1621.38) 4552.12,1621.38 5012.74,2082 5827,2082 5865,2120 v2(5865,2390)
NetR47_1: R47.1 U8.14 U14.3 | length 2643.8
  Top Layer w8: U8.14@4248.58,1368 4250.27,1369.68 4250.27,1407.47 4255,1412.2 v2(4255,1460) ; R47.1@5945,2432.5 5987.94,2389.56 5994.56,2389.56 v2(5995,2390)
  Top Layer w20: R47.1@5945,2432.5 U14.3@5945,2560
  Bottom Layer w8: v2(4255,1460) 4255,1575 4272,1592 4567,1592 5029.5,2054.5 5934.5,2054.5 5995,2115 v2(5995,2390)
NetR48_2: R48.2 U8.15 U15.3 | length 2921.1
  Top Layer w8: U8.15@4228.9,1368 4228.5,1368.4 4228.5,1493.5 4245,1510 v2(4300,1510) ; R48.2@6225,2432.5 6245,2412.5 6252.5,2412.5 v2(6270,2395)
  Top Layer w20: R48.2@6225,2432.5 U15.3@6225,2565
  Bottom Layer w8: v2(4300,1510) 4319,1529 4319,1559 4334,1574 4594,1574 5045,2025 6190,2025 6270,2105 v2(6270,2395)
NetR49_2: R49.2 U8.16 U16.3 | length 3070.6
  Top Layer w8: U8.16@4209.21,1368 4208.5,1368.71 4208.5,1510.98 4240,1542.48 4377.52,1542.48 v2(4380,1540) ; R49.2@6350,2432.5 6351.5,2432.5 6371.5,2412.5 6371.5,2411 6387.5,2395 v2(6395,2395)
  Top Layer w20: R49.2@6350,2432.5 U16.3@6350,2565
  Bottom Layer w8: v2(4380,1540) 4615,1540 5065,1990 6295,1990 6395,2090 v2(6395,2395)
NetR50_1: R50.1 U8.25 U17.3 | length 3526.3
  Top Layer w8: U8.25@3992,1308.27 4056.73,1308.27 4085,1280 v2(4092.76,1280) ; R50.1@6615,2437.5 R50.1@6616.25,2438.75 ; R50.1@6615,2440 R50.1@6616.25,2438.75 ; v2(6665,2390) R50.1@6616.25,2438.75
  Top Layer w20: R50.1@6615,2440 U17.3@6615,2558.94
  Bottom Layer w8: v2(4092.76,1280) 4240,1280 4470,1510 4623.13,1510 5067.13,1954 6554,1954 6665,2065 v2(6665,2390)
NetR51_1: R51.1 U8.26 U18.3 | length 3668.9
  Top Layer w8: U8.26@3992,1288.58 4038.94,1288.58 4074.02,1253.5 v2(4130,1253.5)
  Top Layer w10: R51.1@6750,2437.5 6751.5,2437.5 6799,2390 v2(6800,2390)
  Top Layer w20: R51.1@6750,2437.5 U18.3@6750,2558.94
  Bottom Layer w10: v2(4130,1253.5) 4250.22,1253.5 4486.72,1490 4630,1490 5075,1935 6660,1935 6800,2075 v2(6800,2390)
NetR52_1: R52.1 U8.27 U19.3 | length 3877.1
  Top Layer w8: U8.27@3992.63,1268.9 4033.17,1268.9 4077.07,1225 v2(4100,1225)
  Top Layer w10: R52.1@7000,2432.5 7037.5,2395 v2(7045,2395)
  Top Layer w20: R52.1@7000,2432.5 U19.3@7000,2560
  Bottom Layer w10: v2(4100,1225) 4102.5,1222.5 4247.5,1222.5 4495,1470 4640,1470 5085,1915 6790,1915 7045,2170 v2(7045,2395)
NetU7_1: U7.1 U9.5 | length 1612.9
  Top Layer w8: v2(5225,1290) 5225,1265.53 5226,1264.53 U9.5@5234,1264.53 ; v2(6360,1100) 6363.19,1103.19 U7.1@6501.77,1103.19
  Bottom Layer w8: v2(5225,1290) 5225,1330 5240,1345 5635,1345 5678.5,1301.5 5678.5,1091.5 5706.5,1063.5 6323.5,1063.5 v2(6360,1100)
NetU7_2: U7.2 U9.4 | length 1423.2
  Top Layer w8: U9.4@5346,1264.53 5346,1296 5360,1310 v2(5420,1310) ; v2(6455,1060) 6455.06,1059.94 6501.71,1059.94 U7.2@6501.77,1059.88
  Bottom Layer w8: v2(5420,1310) 5630,1310 5660.5,1279.5 5660.5,1084.04 5699.04,1045.5 6440.5,1045.5 v2(6455,1060)
NetU7_22: U7.22 U7.62 | length 420.9
  Top Layer w8: U7.62@7021.46,892.56 7029.02,885 v2(7060,885) ; U7.22@7119.88,626.81 7142.44,626.81 7160.63,645 v2(7163.5,645)
  Bottom Layer w8: v2(7060,885) 7135,885 7165,855 7165,646.5 v2(7163.5,645)
NetU7_23: U7.23 U7.61 | length 246.8
  Top Layer w8: U7.61@7021.46,837.44 7052.56,837.44 7075,815 7075,680 7081.89,673.11 7116.89,673.11 U7.23@7119.88,670.12
NetU8_21: U8.21 U11.13 | length 1316.2
  Top Layer w8: U11.13@3442.87,837.05 3443.9,836.02 3498.98,836.02 v6(3500,835) ; v2@4086.81,1465 v2@4091.57,1465 ; v2(4095,1465) v2@4091.57,1465 ; U8.21@4110.79,1368 4110.79,1445.78 v2@4091.57,1465
  Bottom Layer w8: v6(3500,835) 3698.48,835 3751,887.52 3751,1381 3835,1465 v2(4095,1465)
NetU8_22: U8.22 U11.15 | length 1217
  Top Layer w8: U11.15@3442.87,888.23 3763.23,888.23 v2(3777.5,902.5) ; v2(4056.5,1438.5) 4080.6,1438.5 4091.1,1427.99 U8.22@4091.1,1368
  Bottom Layer w8: v2(3777.5,902.5) 3777.5,1374.5 3841.5,1438.5 v2(4056.5,1438.5)
NetU8_30: U8.30 U9.1 | length 1862.6
  Top Layer w8: U8.30@3992,1209.84 4038.49,1209.84 4079.83,1168.5 4166.5,1168.5 4185,1150 v2(4185,1120) ; v2(4366.83,903.52) 4428.52,903.52 4462.03,870 5235,870 5340,975 U9.1@5340,1204.97
  Bottom Layer w8: v2(4185,1120) 4185,978.7 4260.19,903.52 v2(4366.83,903.52)
NetU8_31: U8.31 U9.8 | length 1801.2
  Top Layer w8: U8.31@3992,1190.16 4032.71,1190.16 4072.37,1150.5 4129.5,1150.5 4150,1130 v2(4150,1095) ; v2(4365,835) v2(4860,835) ; v2(4925,900) 4941,916 5191,916 5234,959 U9.8@5234,1205.47
  Bottom Layer w8: v2(4150,1095) 4150,935 4250,835 v2(4365,835) ; v2(4860,835) v2(4925,900)
RS232_RX: P1.4 P2.5 U11.16 | length 8908.4
  Top Layer w8: v1(2855,1110) 2862.27,1117.27 3327.27,1117.27 3350,1094.54 3350,950 3387.5,912.5 3360,885 3360,775 3418,717 4041,717 4105,653 P1.4@4105,550 ; 3388.88,913.82 U11.16@3442.87,913.82
  Bottom Layer w8: P2.5@785,4405 684.79,4405 612.79,4477 452,4477 355,4380 355,1000 970,385 2415,385 2512.42,482.42 2512.42,767.42 v1(2855,1110)
RS232_TX: P1.8 P2.1 U11.17 | length 8515.4
  Top Layer w8: v1@3135,1335 3376.93,1093.07 3376.93,955 3392.52,939.41 U11.17@3442.87,939.41 3840.59,939.41 3870,910 3870,750 3885,735 4275,735 4305,705 P1.8@4305,550
  Bottom Layer w12: P2.1@570,4405 570,4310 440,4180 440,1090 437.47,1087.47 437.47,1077.53 1090,425 2145,425 2171,451 2171,515.3 2987.19,1331.49 v1(3126.52,1331.49)
VDD_EXT: U7.40 U7.59 U9.3 U9.6 | length 3399.6
  Top Layer w8: v2(5170,1295) 5170,1255 5180.16,1244.84 U9.6@5234,1244.84 U9.3@5346,1244.84 U9.3@5346.16,1245 ; U7.59@7021.46,727.2 7025.39,727.2 7027.6,725 7050,725 7057,718 7057,613 7080,590 7160,590 7175,605 v2(7180,605)
  Top Layer w10: U7.40@6724.21,1211.46 v2(6724.21,1329.21)
  Bottom Layer w8: v2(5170,1295) 5170,1360 5194,1384 6327.88,1384 6381.88,1330 v2@6724.21,1330 ; v2@6725,1330 7075,1330 7190,1215 7190,618.19 7180,608.19 v2(7180,605)
pads on no net: J5.C6 U4.8 U6.1 U6.5 U6.8 U7.4 U7.5 U7.7 U7.9 U7.10 U7.11 U7.12 U7.14 U7.20 U7.24 U7.25 U7.26 U7.28 U7.29 U7.34 U7.38 U7.43 U7.44 U7.46 U7.47 U7.48 U7.49 U7.50 U7.51 U7.52 U7.53 U7.54 U7.55 U7.56 U7.57 U7.58 U7.60 U7.64 U7.65 U7.68 U8.2 U8.3 U8.4 U8.28 U8.32 U8.38 U8.39 U8.40 U8.41 U8.42 U8.43 U8.45 U8.46 U11.8 U11.9 U11.10 U11.11 U11.12 U11.14

## Polygon pours and split planes (outlines as drawn)
GND on Bottom Layer "GND_L02_P000" (solid, pour order 0): 422.36,5050 375,5003.32 375,4625 75,4625 25,4575 25,750 75,700 375,700 375,50 405,20 3795,20 3810,35 3810,400 4500,400 4500,50 4525,25 7900,25 7925,50 7925,700 8250,700 8275,725 8275,1265 7900,1265 7900,5050 4525,5050 4500,5025 4500,4925 3800,4925 3800,4984.6 3800,5050
GND on Top Layer "GND_L01_P002" (solid, pour order 2): 422.36,5050 375,5003.32 375,4625 75.08,4625 25,4574.92 25,750 75,700 375,700 375,50 405,20 3795,20 3825,50 3825,400 4500,400 4500,50 4525,25 7900,25 7925,50 7925,700 8250,700 8275,725 8275,1221.49 7891.49,1221.49 7890,1220 7890,4995 7835,5050 5455,5050 5455,3119 5410,3065 2940,3065 2845,3160 2845,5050

## Silkscreen, mask and mechanical layers (free items; w line width, h text height)
Top Overlay:
  drawing of 3843 lines, arcs and shapes, not listed
  text "US-LEVEL SENSOR" at 845,4865 h60
  text "MOTOR4" at 3055,4365 h60
  text "MOTOR3" at 3730,4365 h60
  text "MOTOR2" at 4320,4365 h60
  text "MOTOR1" at 4895,4365 h60
  text "1:TX" at 66,4351 h60
  text "2:+20V" at 56,4276 h60
  text "3:GND" at 56,4201 h60
  text "4:GND" at 56,4126 h60
  text "NC" at 3095,4125 h60 r90
  text "NO" at 3275,4125 h60 r90
  text "COM" at 3465,4125 h60 r90
  text "NC" at 3685,4125 h60 r90
  text "NO" at 3865,4125 h60 r90
  text "COM" at 4050,4125 h60 r90
  text "NC" at 4290,4125 h60 r90
  text "NO" at 4470,4125 h60 r90
  text "COM" at 4660,4125 h60 r90
  text "NC" at 4890,4125 h60 r90
  text "NO" at 5075,4125 h60 r90
  text "COM" at 5265,4125 h60 r90
  text "LVL8" at 6980,4120 h60 r90
  text "LVL1" at 5595,4115 h60 r90
  text "LVL2" at 5790,4115 h60 r90
  text "LVL3" at 5990,4115 h60 r90
  text "LVL4" at 6195,4115 h60 r90
  text "LVL5" at 6390,4115 h60 r90
  text "LVL6" at 6590,4115 h60 r90
  text "LVL7" at 6790,4115 h60 r90
  text "+12V" at 7206.82,4110 h60 r90
  text "+12V" at 7409.54,4110 h60 r90
  text "+12V" at 7612.27,4110 h60 r90
  text "GND" at 7815,4110 h60 r90
  text "EXT PWR" at 515,4095 h60
  text "5:RX" at 61,4056 h60
  text "GND" at 285,3930 h60
  text "IN1" at 5595,3765 h60 r90
  text "IN2" at 5800,3765 h60 r90
  text "IN3" at 6000,3765 h60 r90
  text "IN4" at 6200,3765 h60 r90
  text "IN5" at 6400,3765 h60 r90
  text "IN6" at 6595,3765 h60 r90
  text "IN7" at 6800,3765 h60 r90
  text "IN8" at 6990,3765 h60 r90
  text "+12V" at 250,3705 h60
  text "BAT" at 670,2795 h60
  text "GND" at 285,2615 h60
  text "+12V" at 240,2400 h60
  text "+3V8" at 2790,2320 h45
  text "+5V3" at 2420,2290 h40
  text "+3V3" at 2920,1905 h40
  text "SOLAR" at 495,1790 h60
  text "GND" at 290,1615 h60
  text "+14V" at 235,1385 h60
  text "GND" at 2180,415 h40
  text "2:3v3" at 2900,195 h35
  text "4:RX" at 3155,195 h35
  text "6:GND" at 3350,195 h35
  text "8:TX" at 3575,195 h35
  text "2103" at 5550,145 h45
  text "V1I3" at 5550,80 h45
  text "1:SCLK" at 2875,60 h35
  text "3:SDIO" at 3100,60 h35
  text "5:U2RX" at 3345,60 h35
  text "7:U2TX" at 3565,60 h35
  text "DnE AB" at 5550,20 h45
Mechanical 7:
  drawing of 465 lines, arcs and shapes, not listed
  text "Layer" at 347.61,8991.62 h60
  text "Name" at 757.52,8991.62 h60
  text "Material" at 1687.27,8991.62 h60
  text "Thickness" at 2547.03,8991.62 h60
  text "Constant" at 3196.87,8991.62 h60
  text "Board Layer Stack" at 3766.73,8991.62 h60
  text "Top Overlay" at 757.52,8871.62 h60
  text "Top Solder" at 757.52,8751.62 h60
  text "Solder Resist" at 1687.27,8751.62 h60
  text "0.40mil" at 2547.03,8751.62 h60
  text "3.5" at 3196.87,8751.62 h60
  text "1" at 347.61,8631.62 h60
  text "Top Layer" at 757.52,8631.62 h60
  text "Copper" at 1687.27,8631.62 h60
  text "1.40mil" at 2547.03,8631.62 h60
  text "Dielectric1" at 757.52,8511.62 h60
  text "FR-4" at 1687.27,8511.62 h60
  text "12.60mil" at 2547.03,8511.62 h60
  text "4.8" at 3196.87,8511.62 h60
  text "2" at 347.61,8391.62 h60
  text "Bottom Layer" at 757.52,8391.62 h60
  text "Copper" at 1687.27,8391.62 h60
  text "1.40mil" at 2547.03,8391.62 h60
  text "Bottom Solder" at 757.52,8271.62 h60
  text "Solder Resist" at 1687.27,8271.62 h60
  text "0.40mil" at 2547.03,8271.62 h60
  text "3.5" at 3196.87,8271.62 h60
  text "Bottom Overlay" at 757.52,8151.62 h60
BORDER LAYER:
  lines w5: 354.33,679.13 354.33,70 ccw(c422.17,67.83) 420,0 3764.54,0 ; 354.33,680 60,680 cw(c62.5,742.5) 0,745 0,4557.34 cw(c76.79,4558.21) 75.91,4635 355,4635 ; 354.33,4635 ccw(c354.33,4635.67) 355,4635.67 355,5025 cw(c405,5025) 405,5075 3780,5075 cw(c3780,5025) 3830,5025 ; 3764.54,-0.43 ccw(c3766.35,71.8) 3838.58,70 3838.58,374.02 3840,374.02 ; 3830,5000.98 3830,5025 ; 3839.29,4940.98 3830.98,4940.98 3830,4941.97 3830,5025 ; 3840,375 4469.92,375 ; 3840,4940.98 3838.58,4940.98 4470,4940.98 4470,5003.32 ; 4470,374.02 4470,55 ccw(c4524.99,54.99) 4524.98,0 7900,0 ; 4470,5004.01 cw(c4540,5003.32) 4540.7,5073.31 ; 4540,5074.02 7900,5074.02 cw(c7902.99,5027.06) 7950,5025.05 ; 7900,-0.25 ccw(c7900,50) 7950.25,50 ; 7950,50 7950,680 8238.27,680 ccw(c8238.54,748.54) 8307.09,748.27 8307.09,4567.52 ; 7950,4635 8240,4635 cw(c8240,4567.52) 8307.48,4567.52 ; 7950,4635.83 7950,5035

## Text inside footprints (layer, text, board x,y; h text height)
D6: Mechanical 13 "*" at 2220,4301.4 h50 r90
K1: Top Overlay "*" at 5280,2449 h50 r180
K2: Top Overlay "*" at 4636.33,2449 h50 r180
K3: Top Overlay "*" at 3992.67,2449 h50 r180
K4: Top Overlay "*" at 3349,2449 h50 r180
P1: Top Overlay "2" at 3905,530 h50; Top Overlay "1" at 3925,430 h50; Top Overlay "7" at 4365,430 h50; Top Overlay "8" at 4365,530 h50
P2: Top Overlay "1" at 459,4399 h60 r180; Top Overlay "2" at 464,4589 h60 r180; Top Overlay "3" at 699,4769 h60 r180; Top Overlay "4" at 919,4629 h60 r180; Top Overlay "5" at 914,4389 h60 r180
U5: Mechanical 13 "TAB" at 1773.75,226.5 h25 r180; Mechanical 7 "0.1in/2.54mm" at 1880,457 h25 r180; Mechanical 7 "0.402in/10.211mm" at 1855,119 h25 r180
U8: Top Overlay "*" at 4365,1090 h50 r180; Mechanical 13 "*" at 4299.5,1106.89 h50 r180
U9: Mechanical 13 "*" at 5334.5,1246.5 h50 r180